# Altium PCB xiaozhi_speaker.PcbDoc
Units mm, origin at the board's own origin, x right, y up, seen from the top; angles counter-clockwise.
Board outline 20 x 40 mm, 2 copper layers (Top Layer, Bottom Layer); 16 components, 14 nets, 55 pads, 7 vias.
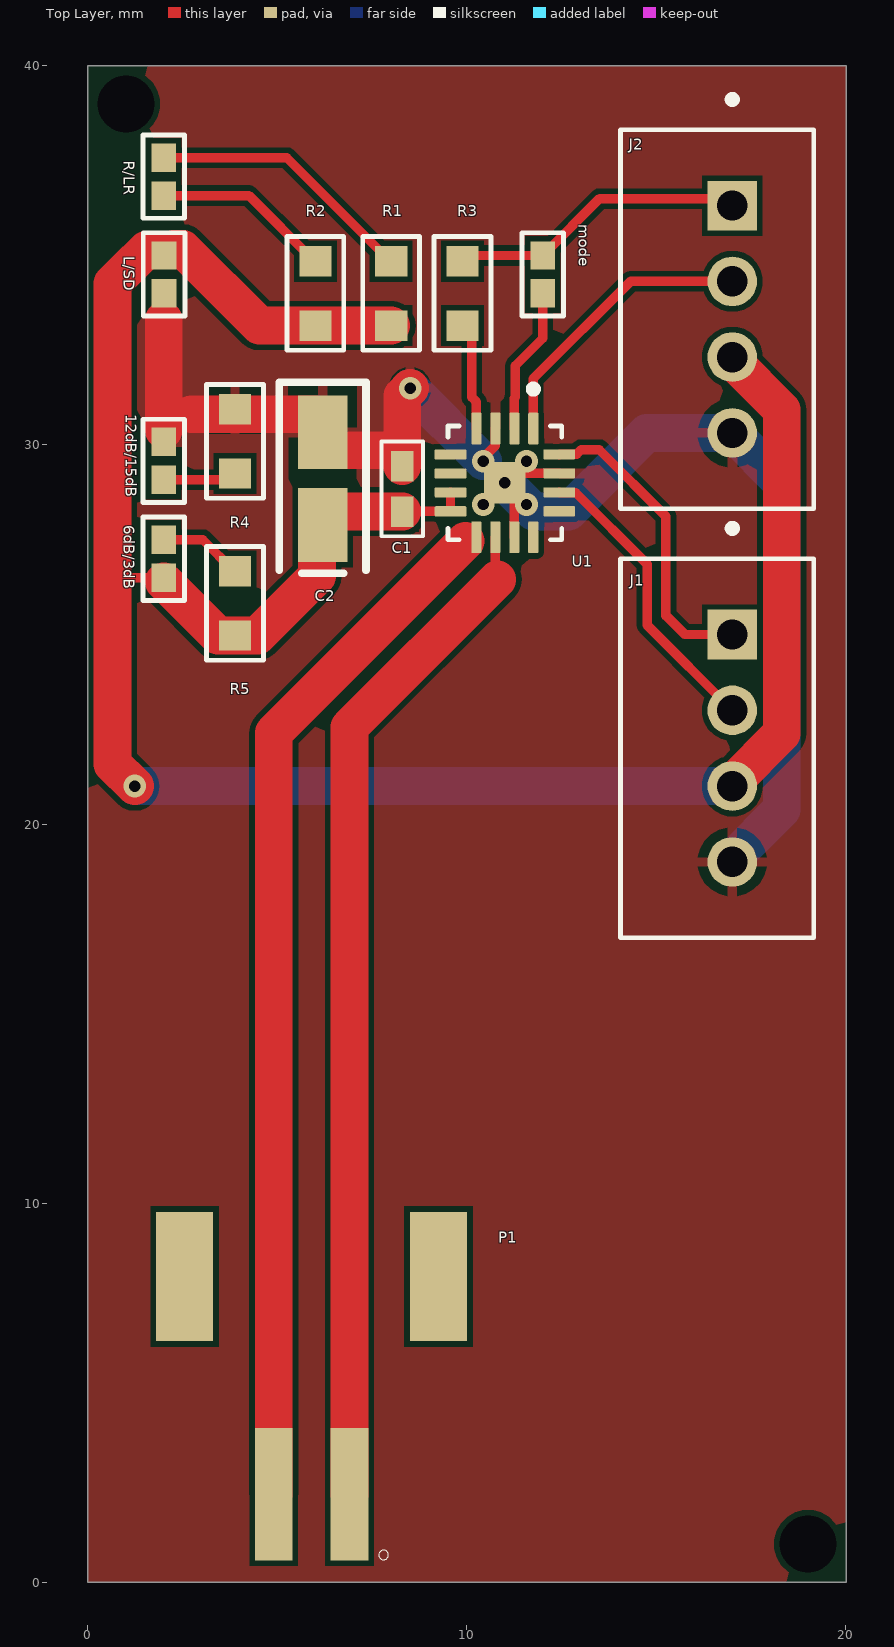
[diagram p0: Top Layer view]
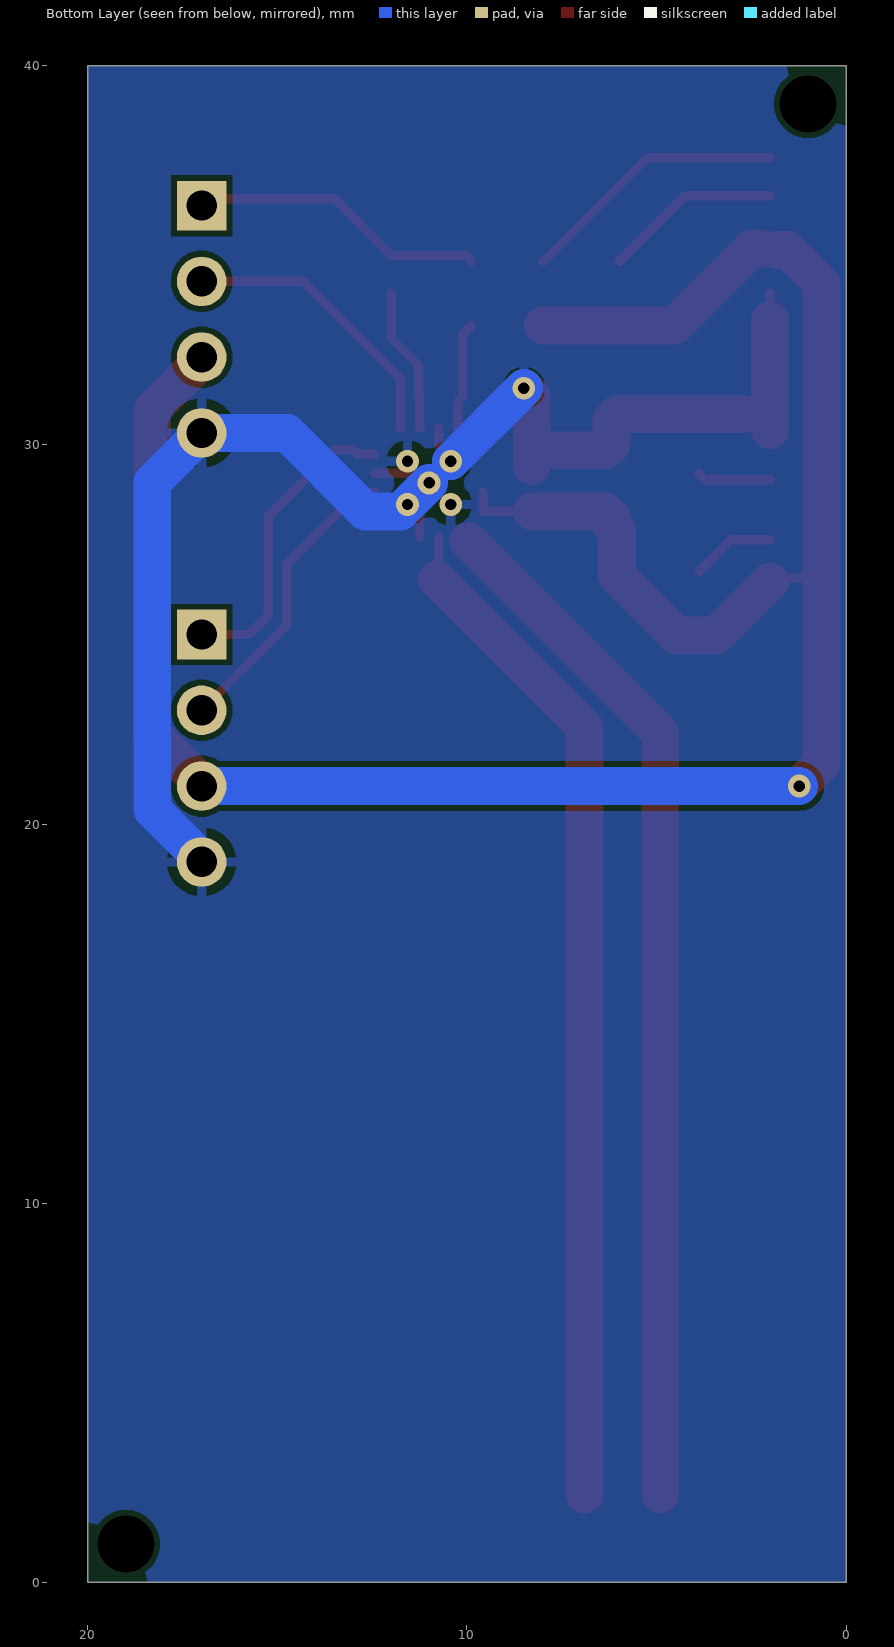
[diagram p1: Bottom Layer view, seen from below]
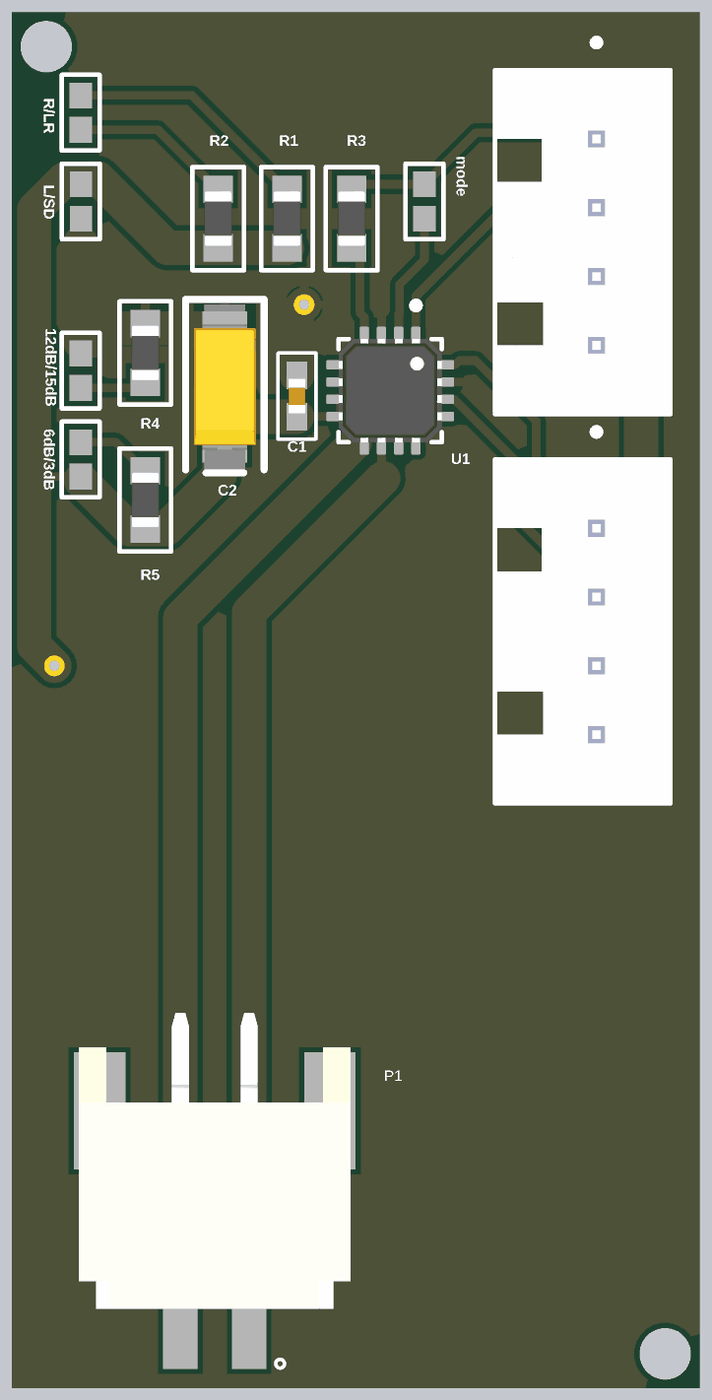
[diagram p2: 3D render of the assembled board from above, using the file's embedded part models]

## Layer stack, top to bottom
Top Solder: solder mask 0.0102, Solder Resist, Dk 3.5
Top Layer: signal copper 0.0356
Dielectric 1: dielectric 0.32, FR-4, Dk 4.8
Bottom Layer: signal copper 0.0356
Bottom Solder: solder mask 0.0102, Solder Resist, Dk 3.5

## Board outline
0,0 20,0 20,40 0,40

## Design rules (kind name [scope] priority, off if disabled: settings)
Clearance [All] p1: gap=0.15 ignorepadtopadclearanceinfootprint=FALSE
MinimumSolderMaskSliver [All] p1: minsoldermaskwidth=0.15
PolygonConnect [All] p1: connectstyle=Relief reliefconductorwidth=0.254 reliefentries=4 polygonreliefangle="90 Angle" airgapwidth=0.254
RoutingVias [All] p1: holewidth=0.3 width=0.6 viastyle="Through Hole" minholewidth=0.3 minwidth=0.6 maxholewidth=0.3 maxwidth=0.6
SilkToSilkClearance [All] p1: silktosilkclearance=0.15
SilkToSolderMaskClearance [IsPad] p1: minsilkscreentomaskgap=0.15 clearancetoexposedcopper=TRUE
SolderMaskExpansion [All] p1: expansion=0 istentingtop=FALSE
SupplyNets "Schematic Supply Nets_1" [InNet('GND')] p1: voltage=0.000
Width Width_1 [InNetClass('Power_nets')] p1: maxlimit=1.5 minlimit=0.25 preferedwidth=1
Width [InNetClass('Signal_nets')] p2: maxlimit=0.5 minlimit=0.15 preferedwidth=0.25
27 further rules are at their usual default settings.

## Classes and differential pairs
net class signal_nets: BCLK DIN LRCLK Net6dB/3dB_2 Net15dB/12dB_2 Netmode_2 NetR1_2 NetR2_2 NetR3_1 SD_MODE
net class Power_nets: GND OUTN OUTP VDD

## Components (designator, comment, footprint, x,y, rotation, side; value= is the part's Value field where it differs from the comment)
6dB/3dB "JUMP 2 Open" JUMP/2/SMD/0402 2,27 r90 top
12dB/15dB "JUMP 2 Open" JUMP/2/SMD/0402 2,29.581 r270 top (schematic designator 15dB/12dB)
C1 "100nF" "C 0402" 8.291,28.842 r90 top
C2 "10uF" "C SMD TAN 1206 (A)" 6.192,29.112 r90 top
J1 "110990030" SEEED_110990030 17,22 r270 top
J2 "110990030" SEEED_110990030 17,33.318 r270 top
L/SD "JUMP 2 Open" JUMP/2/SMD/0402 2.007,34.5 r90 top (schematic designator SD/L)
mode "JUMP 2 Open" JUMP/2/SMD/0402 12,34.5 r270 top
P1 "S2B-PH-SM4-TB" JST_S2B-PH-SM4-TB 5.9,2.314 r0 top
R1 "280k" "R 0603" 8,34 r90 top
R2 "750k" "R 0603" 6,34 r90 top
R3 "2k" "R 0603" 9.881,34 r90 top
R4 "100k" "R 0603" 3.88,30.096 r90 top
R5 "100k" "R 0603" 3.88,25.823 r270 top
R/LR "JUMP 2 Open" JUMP/2/SMD/0402 2,37.081 r270 top
U1 "MAX98357AETE+T" QFN50P300X300X80-17N 11,29 r270 top

## Footprints (in the part's own frame and the unit in brackets; to place one, negate y for a bottom-side part, rotate by r counter-clockwise, add the part's x,y. Pads: shape width x height; smd on the part's side, far side on the other; paste and mask are expansions set on the pad)
"C 0402" [mm] "Chip Capacitor, 2-Leads, Body 1.0x0.5mm, IPC Medium Density"
  rect 0.8x0.6 smd: 1(-0.6,0) 2(0.6,0)
  silkscreen extent -1.25,-0.55 1.25,0.55, body extent -0.5,-0.25 0.5,0.25, height 0.6
"C SMD TAN 1206 (A)" [mm] "Molded Capacitor, 2-Leads, Body 3.2x1.6mm, IPC Medium Density"
  rect 1.95x1.3 smd: 1(-1.225,0) 2(1.225,0)
  silkscreen extent -2.5,-1.14 2.54,1.14, body extent -2.4,-0.9 2.4,0.9, height 1.8
JST_S2B-PH-SM4-TB [mm]
  rect 1x3.5 smd: 1(1,0) 2(-1,0)
  rect 1.5x3.4 smd: P1(3.35,5.75) P2(-3.35,5.75)
  silkscreen extent 1.77,-1.73 2.03,-1.47, body extent -3.95,0 3.95,8.6, height 5.5
JUMP/2/SMD/0402 [mm]
  rect 0.75x0.65 smd: 1(-0.5,0) 2(0.5,0)
  silkscreen extent -1.1,-0.55 1.1,0.55
QFN50P300X300X80-17N [mm]
  rrect25% 0.84x0.27 smd: 1(-1.435,0.75) 2(-1.435,0.25) 3(-1.435,-0.25) 4(-1.435,-0.75) 9(1.435,-0.75) 10(1.435,-0.25) 11(1.435,0.25) 12(1.435,0.75)
  rrect25% 0.27x0.84 smd: 5(-0.75,-1.435) 6(-0.25,-1.435) 7(0.25,-1.435) 8(0.75,-1.435) 13(0.75,1.435) 14(0.25,1.435) 15(-0.25,1.435) 16(-0.75,1.435)
  rect 1.1x1.1 smd paste-0.2: 17(0,0)
  silkscreen extent -2.57,-1.5 1.5,1.5, body extent -1.5,-1.5 1.5,1.5, height 0.9
"R 0603" [mm] "Chip Resistor, 2-Leads, Body 1.6x0.8mm, IPC Medium Density"
  rect 0.8x0.85 smd: 1(-0.85,0) 2(0.85,0)
  silkscreen extent -1.5,-0.75 1.5,0.75, body extent -0.8,-0.4 0.8,0.4, height 0.5
SEEED_110990030 [mm]
  rect 1.308x1.308 / inner round 1.308 / far side rect 1.308x1.308 hole 0.8: 1(-3,0)
  round 1.308 hole 0.8: 2(-1,0) 3(1,0) 4(3,0)
  silkscreen extent -5.9,-2.95 5,2.15, body extent -5,-2.95 5,2.15, height 8.1

## Part data
C1: library part "Capacitor NP", "Capacitor non-pol"
C2: library part Capacitor, "Capacitor pol"
J1 J2: "GROVE 2MM 4PIN VERT CONN 10PCS", PACKAGE=None, Check_prices=https://www.snapeda.com/parts/110990030/Seeed+Studio/view-part/?ref=eda, MF="Seeed Technology", MP=110990030, SnapEDA_Link=https://www.snapeda.com/parts/110990030/Seeed+Studio/view-part/?ref=snap
P1: "Connector Header Surface Mount, Right Angle 2 position 0.079 (2.00mm)", PACKAGE=None, Check_prices=https://www.snapeda.com/parts/S2B-PH-SM4-TB/JST/view-part/?ref=eda, MF="JST Sales", MP=S2B-PH-SM4-TB, SnapEDA_Link=https://www.snapeda.com/parts/S2B-PH-SM4-TB/JST/view-part/?ref=snap
R1 R2 R3 R4 R5: library part Resistor, "Resistor"
U1: "Tiny, Low-Cost, PCM Class D Amplifier with Class AB Performance", PACKAGE="TQFN-16 Maxim", Check_prices=https://www.snapeda.com/parts/MAX98357AETE+T/Analog+Devices/view-part/?ref=eda, MF="Analog Devices", MP=MAX98357AETE+T, SnapEDA_Link=https://www.snapeda.com/parts/MAX98357AETE+T/Analog+Devices/view-part/?ref=snap

## Free pads (board coordinates)
  round 0 hole 1.5 unplated: 3(1,39) 3(19,1)

## Via types
v1: diameter 0.6, hole 0.3, Top Layer to Bottom Layer, 7 vias

## Nets (pads, with @x,y where several pads share a name; then routed paths per layer and width w, separated by ;. In a path a pad name is that pad's centre, name@x,y a point inside that pad or via, vN(x,y) a via of type N, cw(c..) or ccw(c..) an arc to the next point about the centre after c; other vN are vias at no path point)
BCLK: J1.1 U1.16 | length 8.2
  Top Layer w0.25: U1.16@12.436,29.749 12.447,29.76 12.896,29.76 13.012,29.876 13.488,29.876 15.25,28.114 15.25,25.5 15.75,25 J1.1
DIN: J2.2 U1.1 | length 7.6
  Top Layer w0.25: U1.1 11.75,31.75 14.318,34.318 J2.2
GND: 12dB/15dB.1 C1.2 C2.2 J1.4 J2.4 L/SD.1 R4.2 U1.3 U1.11 U1.15 U1.17 | length 38.5
  Top Layer w0.25: 2,33.3 2,33.993 L/SD.1 ; U1.3 10.74,30.425 10.74,29.977 10.429,29.666 v1(10.429,29.571) v1(11,29) ; U1.11 11.25,28.75 v1(11,29) ; U1.15 12.425,29.26 11.26,29.26 v1(11,29)
  Top Layer w1: 12dB/15dB.1@2,30.4 2,33.3 ; 2.731,30.812 6.042,30.812 6.192,30.662 C2.2 6.192,30.012 6.342,29.862 7.871,29.862 ; C1.2 8.291,29.862 8.291,31.291 v1(8.5,31.5)
  Bottom Layer w1: v1(8.5,31.5) v1(10.429,29.571) ; v1(11,29) v1(11.571,28.429) ; v1@11.75,28.25 12.675,28.25 14.742,30.318 J2.4@16.943,30.318 ; J1.4 17,19.083 18.304,20.387 18.304,29.014 J2.4
  other v1: 10.429,28.429 11.571,29.571
LRCLK: J1.2 U1.14 | length 7.9
  Top Layer w0.25: U1.14 12.445,28.74 12.869,28.74 14.75,26.859 14.75,25.25 J1.2
Net6dB/3dB_2: 6dB/3dB.2 R5.1 | length 2.2
  Top Layer w0.25: 6dB/3dB.2 3.028,27.5 3.855,26.673 R5.1
Net15dB/12dB_2: 12dB/15dB.2 R4.1 | length 1.9
  Top Layer w0.25: 12dB/15dB.2 3.715,29.081 R4.1
Netmode_2: mode.2 U1.2 | length 3.9
  Top Layer w0.25: U1.2 11.25,31.237 11.275,31.262 11.275,32.091 12,32.816 mode.2
NetR1_2: R1.2 R/LR.1 | length 7.1
  Top Layer w0.25: R/LR.1 5.244,37.581 7.975,34.85 R1.2
NetR2_2: R2.2 R/LR.2 | length 4.7
  Top Layer w0.25: R/LR.2 4.244,36.581 5.975,34.85 R2.2
NetR3_1: R3.1 U1.4 | length 2.9
  Top Layer w0.25: R3.1 10.125,32.906 10.125,31.262 10.25,31.137 U1.4
OUTN: P1.1 U1.10 | length 26.9
  Top Layer w0.25: U1.10 10.75,26.5 10.798,26.452
  Top Layer w1: P1.1 6.9,22.554 10.798,26.452
OUTP: P1.2 U1.9 | length 27.6
  Top Layer w0.25: 9.965,27.465 10.24,27.465 10.25,27.475 U1.9
  Top Layer w1: P1.2 4.9,22.4 9.965,27.465
SD_MODE: J2.1 mode.1 R3.2 | length 7.9
  Top Layer w0.25: R3.2 10.031,35 mode.1 13.5,36.5 16.818,36.5 J2.1
VDD: 6dB/3dB.1 C1.1 C2.1 J1.3 J2.3 L/SD.2 R1.1 R2.1 R5.2 U1.7 U1.8 | length 62.3
  Top Layer w0.25: 0.65,26.5 6dB/3dB.1 ; L/SD.2 2.182,35.175 L/SD.2@2.275,35.175 ; C1.1 8.299,28.25 U1.8 U1.7
  Top Layer w1: v1(1.236,21) 0.65,21.586 0.65,26.5 0.65,34.263 1.032,34.644 1.537,35.15 L/SD.2@1.85,35.15 ; 6dB/3dB.1@2,26.4 3.427,24.973 R5.2 4.473,24.973 6.042,26.542 6.042,27.737 C2.1 6.192,28.092 6.342,28.242 C1.1 ; L/SD.2@2.275,35.175 2.5,35.175 4.525,33.15 R2.1 R1.1 ; J1.3 17,21.083 18.304,22.387 18.304,30.93 17,32.234 J2.3
  Bottom Layer w1: v1(1.236,21) J1.3
pads on no net: P1.P1 P1.P2 U1.5 U1.6 U1.12 U1.13

## Polygon pours and split planes (outlines as drawn)
GND on Bottom Layer "GND_L02_P001" (solid, remove dead copper, pour order 1): 0,0 20,0 20,40 0,40
GND on Top Layer "GND_L01_P000" (solid, remove dead copper, pour order 0): 0,0 20,0 20,40 0,40